# Altium PCB Electrode_Flat_25x20.PcbDoc
Units mm, origin at the board's own origin, x right, y up, seen from the top; angles counter-clockwise.
Board outline 25 x 20 mm, 2 copper layers (Top Layer, Bottom Layer); 7 components, 6 nets, 14 pads, 4 vias.
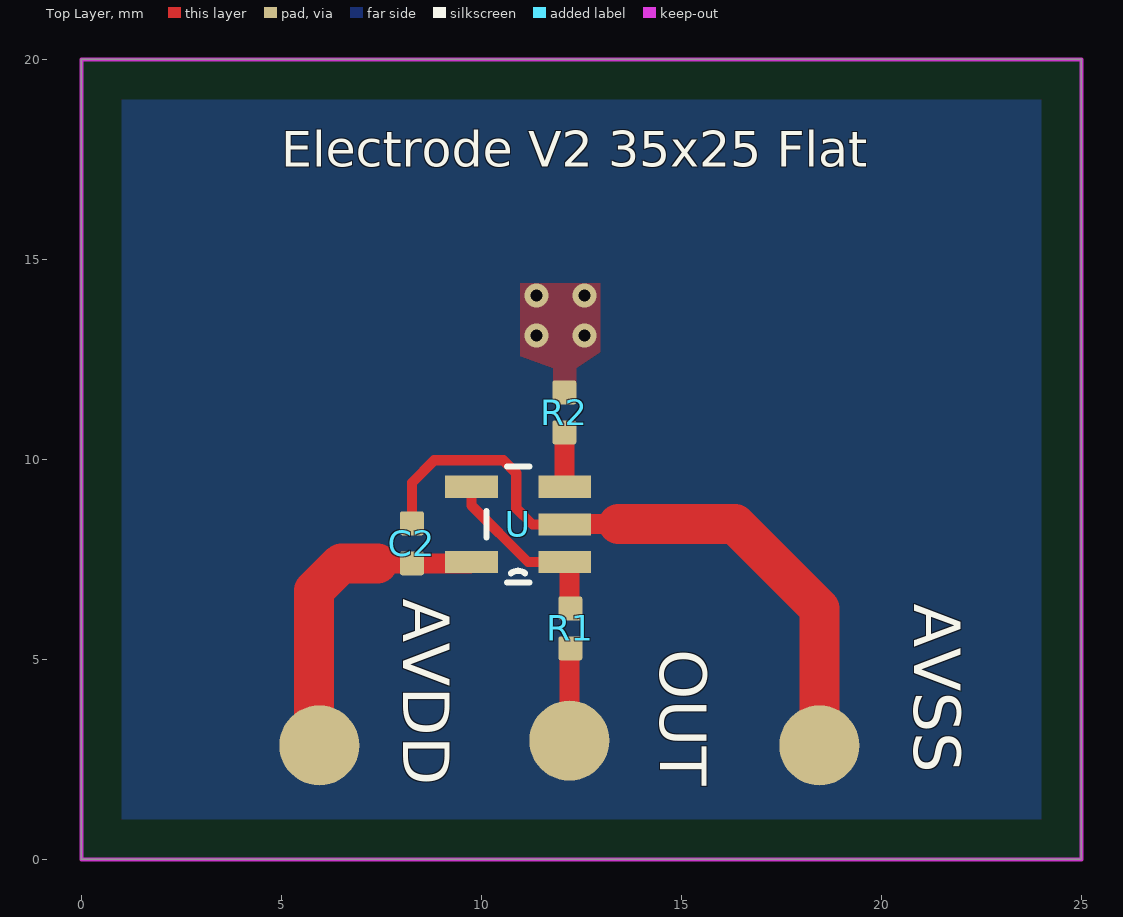
[diagram p0: Top Layer view]
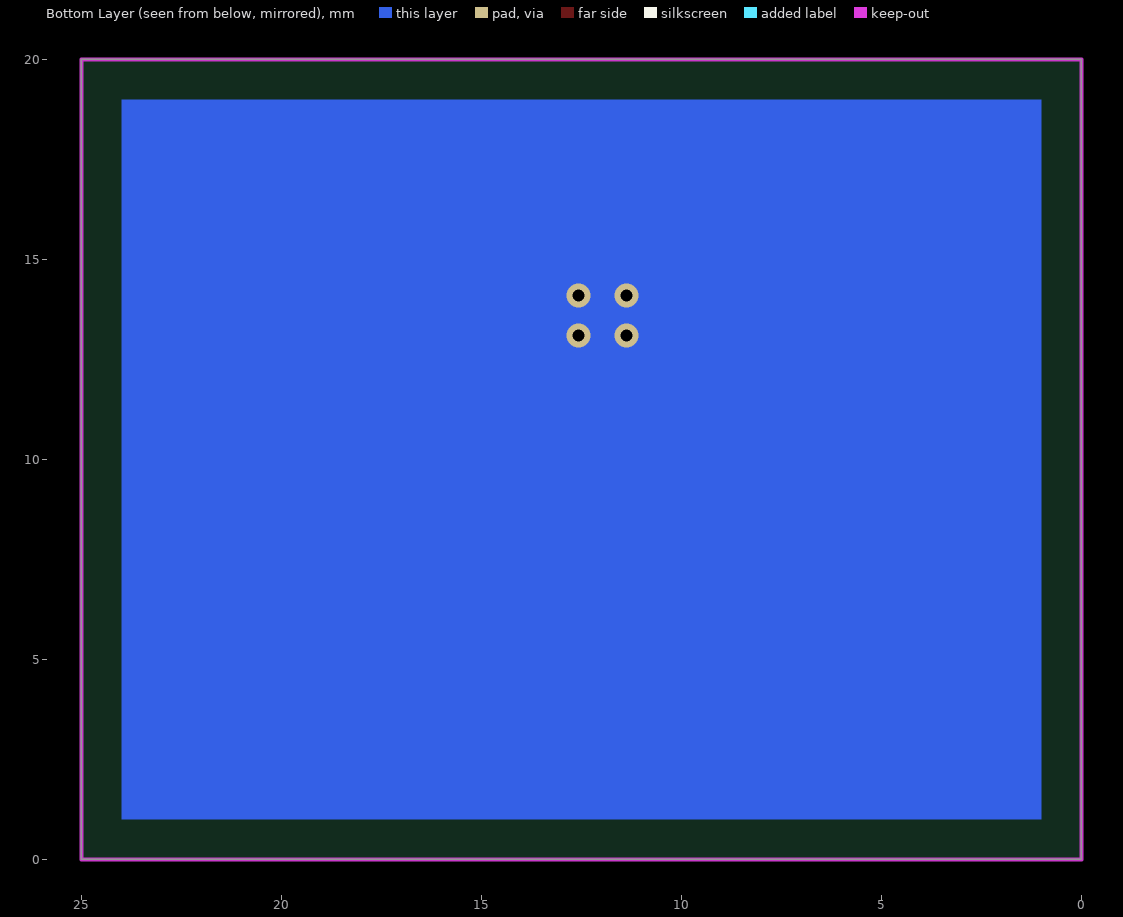
[diagram p1: Bottom Layer view, seen from below]
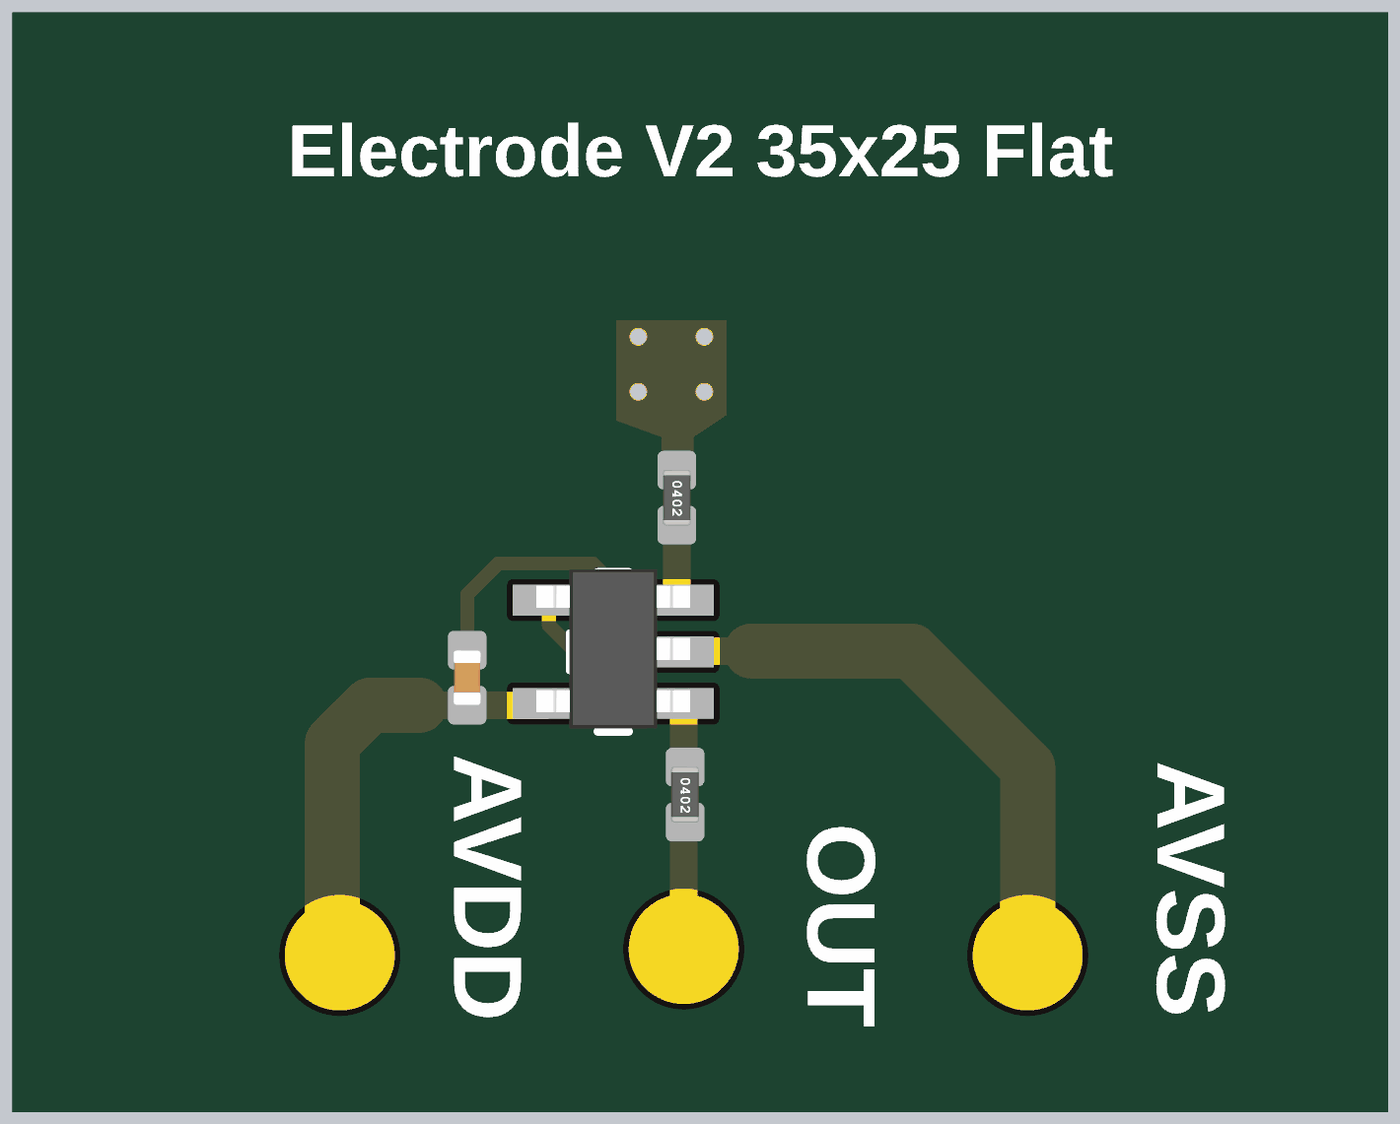
[diagram p2: 3D render of the assembled board from above, using the file's embedded part models]

## Layer stack, top to bottom
Top Solder: solder mask 0.0102, Solder Resist, Dk 3.5
Top Layer: signal copper 0.0356
Dielectric 1: dielectric 0.32, FR-4, Dk 4.8
Bottom Layer: signal copper 0.0356
Bottom Solder: solder mask 0.0102, Solder Resist, Dk 3.5

## Board outline
0,0 0,20 25,20 25,0

## Design rules (kind name [scope] priority, off if disabled: settings)
Clearance [All] p1: gap=0.15 ignorepadtopadclearanceinfootprint=FALSE
HoleSize [All] p1: absolutevalues=TRUE maxlimit=20 minlimit=0.025 maxpercent=80.000 minpercent=20.000
PolygonConnect [All] p1: connectstyle=Direct reliefconductorwidth=0.254 reliefentries=4 polygonreliefangle="90 Angle" airgapwidth=0.254
RoutingVias [All] p1: holewidth=0.711 width=1.27 viastyle="Through Hole" minholewidth=0.3 minwidth=0.6 maxholewidth=0.711 maxwidth=1.27
SolderMaskExpansion [All] p1: expansion=0.102 istentingtop=FALSE
SupplyNets "Schematic Supply Nets_1" [InNet('AVSS')] p1: voltage=0.000
SupplyNets "Schematic Supply Nets" [InNet('AVDD')] p2: voltage=0.000
Width [All] p1: maxlimit=2 minlimit=0.254 preferedwidth=0.254
29 further rules are at their usual default settings.

## Components (designator, comment, footprint, x,y, rotation, side; value= is the part's Value field where it differs from the comment)
AVDD "AVDD" "TESTPOINT 1.2MM"#1 8.622,2.75 r0 top (schematic designator TP1)
AVSS "AVSS" "TESTPOINT 1.2MM"#2 21.722,3.05 r0 top (schematic designator TP3)
C2 "" C0402L 8.265,7.9 r90 top
OUT "OUT" "TESTPOINT 1.2MM"#3 12.843,3.017 r0 top (schematic designator TP2)
R1 "100R" R0402L 12.225,5.775 r270 top
R2 "56K" R0402L 12.075,11.175 r270 top
U "AD8603AUJZ-R2" SOT95P280X100-5N 10.919,8.371 r180 top

## Footprints (in the part's own frame and the unit in brackets; to place one, negate y for a bottom-side part, rotate by r counter-clockwise, add the part's x,y. Pads: shape width x height; smd on the part's side, far side on the other; paste and mask are expansions set on the pad)
C0402L [mm]
  rrect20% 0.6x0.6 smd paste+0.05 mask+0.05: 1(-0.5,0) 2(0.5,0)
  body extent -0.5,-0.25 0.5,0.25, height 0.49
R0402L [mm]
  rrect20% 0.6x0.6 smd paste+0.05 mask+0.05: 1(-0.5,0) 2(0.5,0)
  body extent -0.51,-0.25 0.51,0.25, height 0.51
SOT95P280X100-5N [mil]
  rect 52x22 smd: 1(-46,37) 2(-46,0) 3(-46,-37) 4(46,-37) 5(46,37)
  silkscreen extent -11,-57 31,57, body extent -55,-59 55,55, height 39
"TESTPOINT 1.2MM"#1 [mm]
  round 2 smd paste-1 mask+0.1: 1(-2.672,0.1)
"TESTPOINT 1.2MM"#2 [mm]
  round 2 smd paste-1 mask+0.1: 1(-3.272,-0.2)
"TESTPOINT 1.2MM"#3 [mm]
  round 2 smd paste-1 mask+0.1: 1(-0.643,-0.05)

## Part data
AVDD AVSS OUT: library part "Test point", "Test point", Value1=N/A, Value2=N/A
C2: library part C0402_1, "CAP 0402 100nF 16V Y5V", MPN=CL05B104KO5NNNC, Value1=100nF, Value2=16V, Comment Description="Cap 0.1uF 16V 0402", Manu="Samsung Electro-Mechanics", Type=Capacitor
R1 R2: library part R0402_4_1, Case=0603, MPN="FRC0603J2R0 TS", Value1=2R, Value2=100mW, Comment Description="2Ω ±5% 100mW 0603 Thick Film Resistor", Manu=FOJAN, Type=Resistor
U: "General Purpose Amplifier 1 Circuit Rail-to-Rail TSOT-5", Package="TSOT-5 Analog Devices", Availability=Unavailable, MF="Analog Devices", MP=AD8603AUJZ-R2, Price=None, SnapEDA_Link=https://www.snapeda.com/parts/AD8603AUJZ-R2/Analog%20Devices/view-part/574456/?ref=snap

## Via types
v1: diameter 0.6, hole 0.3, Top Layer to Bottom Layer, tented both sides, 4 vias

## Nets (pads, with @x,y where several pads share a name; then routed paths per layer and width w, separated by ;. In a path a pad name is that pad's centre, name@x,y a point inside that pad or via, vN(x,y) a via of type N, cw(c..) or ccw(c..) an arc to the next point about the centre after c; other vN are vias at no path point)
AVDD: AVDD.1 C2.1 U.5 | length 7
  Top Layer w0.5: 7.7,7.4 C2.1 9.72,7.4 U.5
  Top Layer w1: AVDD.1@5.815,3.671 5.815,6.715 6.5,7.4 7.4,7.4
AVSS: AVSS.1 C2.2 U.2 | length 17.1
  Top Layer w0.254: C2.2 8.265,9.415 8.825,9.975 10.55,9.975 10.875,9.65 10.875,8.775 11.279,8.371 U.2
  Top Layer w0.5: U.2 12.102,8.386 13.434,8.386
  Top Layer w1: 13.434,8.386 16.339,8.386 18.45,6.275 AVSS.1@18.45,2.642
NetR1_1: R1.1 U.1 U.4 | length 4.6
  Top Layer w0.254: U.4 9.751,8.849 11.169,7.431 U.1
  Top Layer w0.5: U.1 12.2,7.319 R1.1@12.2,6.275
NetR2_2: R2.2 U.3 | length 1.4
  Top Layer w0.5: R2.2 12.075,9.324 U.3
POGO_RAW: R2.1
  other v1: 11.375,13.1 12.575,13.1 11.375,14.1 12.575,14.1
SIGNAL_OUT: OUT.1 R1.2 | length 1.5
  Top Layer w0.5: OUT.1 OUT.1@12.235,3.002 ; OUT.1@12.2,3.823 R1.2@12.2,5.275

## Polygon pours and split planes (outlines as drawn)
POGO_RAW on Top Layer "POGO_RAW_L01_P001" (solid, remove dead copper, pour order 1): 10.975,14.4 12.975,14.4 12.975,12.675 12.375,12.275 12.375,11.875 11.775,11.875 11.8,11.9 11.8,12.275 10.975,12.575

## Keep-outs
Keep-Out Layer:
  the board outline again, w0.1

## Other copper
Bottom Layer:
  rectangle net POGO_RAW: 1,1 24,19

## Silkscreen, mask and mechanical layers (free items; w line width, h text height)
Top Overlay:
  text "Electrode V2 35x25 Flat" at 5,17.018 h1.52
Bottom Solder:
  rectangle: 0,0 25,20